# Altium PCB board.PcbDoc (part 2 of 3)
Units mm, origin at the board's own origin, x right, y up, seen from the top; angles counter-clockwise.
Board outline 86 x 120 mm, 4 copper layers (Top Layer, Signal Layer 1, Signal Layer 2, Bottom Layer), stack 1.571 mm thick; 144 components, 93 nets, 930 pads, 372 vias.
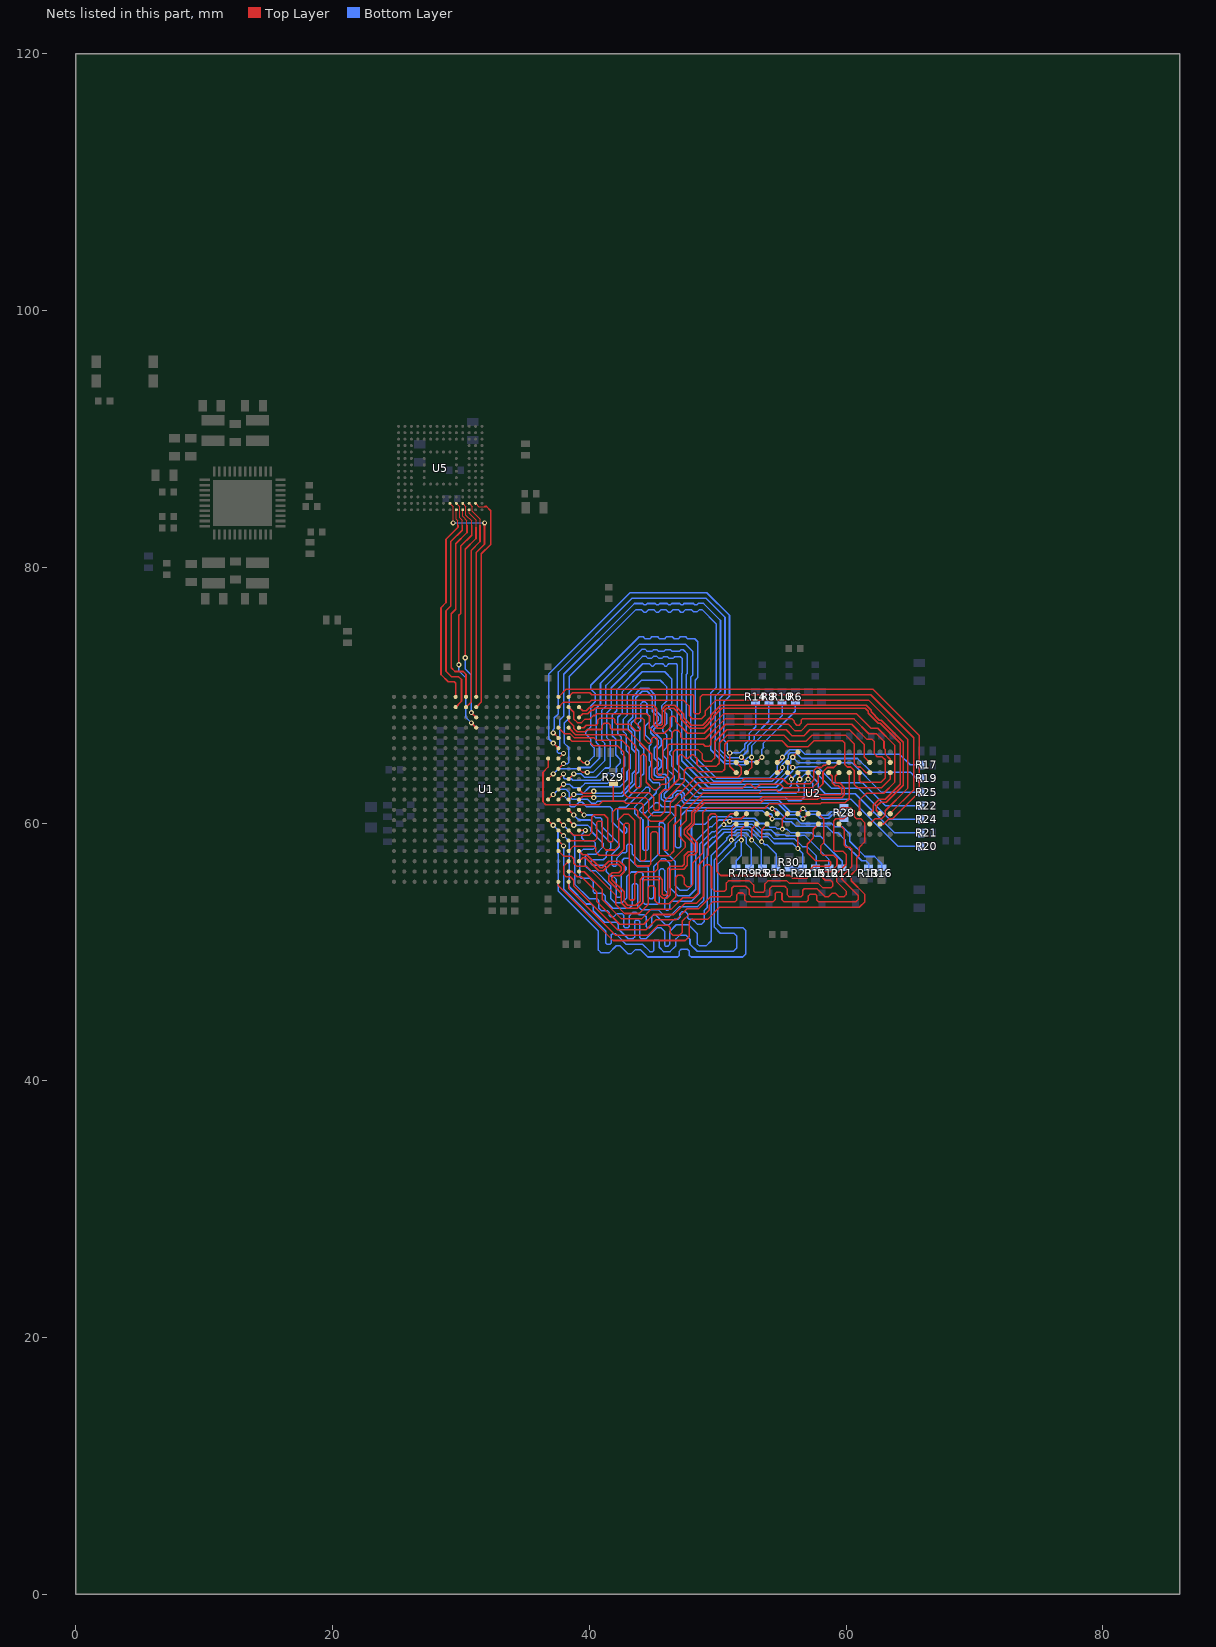
[diagram p4: the nets of this part, all layers, seen from the top]

## Via types
v1: diameter 0.4, hole 0.2, Top Layer to Bottom Layer, tented both sides, 309 vias
v2: diameter 0.6, hole 0.3, Top Layer to Bottom Layer, tented both sides, 61 vias
v3: diameter 0.4, hole 0.2, Top Layer to Signal Layer 1, tented top, 2 vias

## Nets (pads, with @x,y where several pads share a name; then routed paths per layer and width w, separated by ;. In a path a pad name is that pad's centre, name@x,y a point inside that pad or via, vN(x,y) a via of type N, cw(c..) or ccw(c..) an arc to the next point about the centre after c; other vN are vias at no path point) (continued)
DDR_A4: R5.1 U1.P17 U2.P8 | length 39.6
  Top Layer w0.12: U1.P17@37.6,59.5 v1(38,59.1) ; v1(52.65,58.75) 52.65,59.6 U2.P8@53.05,60
  Bottom Layer w0.12: v1(38,59.1) 38.44,58.66 38.44,55.117 39.787,53.77 40.16,53.77 40.32,53.61 40.32,53.237 41.217,52.34 42.13,52.34 42.27,52.2 42.27,51.836 43.046,51.06 43.39,51.06 43.53,51.2 43.53,52.41 43.615,52.495 43.845,52.495 43.95,52.39 43.95,51.16 44.05,51.06 44.43,51.06 45.304,51.934 45.574,51.934 45.869,51.639 45.869,50.571 45.96,50.48 46.12,50.48 46.29,50.65 46.29,51.648 46.786,52.144 47.732,52.144 48.43,51.446 48.43,50.65 48.58,50.5 49.1,50.5 49.5,50.9 49.5,57.55 50.71,58.76 50.71,58.899 50.921,59.11 51.37,59.11 51.59,59.33 52.19,59.33 52.65,58.87 v1(52.65,58.75) 52.679,58.75 53.41,58.019 53.41,56.7 R5.1@53.5,56.61
DDR_A5: R6.1 U1.H17 U2.P2 | length 43.5
  Top Layer w0.12: U1.H17@37.6,64.3 v1(38,64.7) ; U2.P2@53.05,64.8 v1(53.45,65.2)
  Bottom Layer w0.12: v1(38,64.7) 38.3,64.7 38.4,64.8 38.4,65.95 38.04,66.31 38.04,67.843 38.44,68.243 38.44,71.498 43.642,76.7 44.044,76.7 44.259,76.484 44.416,76.484 44.631,76.7 45.019,76.7 45.244,76.475 45.381,76.475 45.606,76.7 45.969,76.7 46.164,76.504 46.346,76.504 46.541,76.7 46.936,76.7 47.136,76.5 47.3,76.5 47.5,76.7 47.954,76.7 48.139,76.514 48.4,76.514 48.586,76.7 48.787,76.7 49.9,75.587 49.9,70.625 49.475,70.2 49.475,65.775 50.56,64.69 51.39,64.69 51.46,64.62 52.15,64.62 52.37,64.84 53.09,64.84 v1(53.45,65.2) 53.45,65.811 53.59,65.951 53.57,65.971 53.57,66.3 56.05,68.78 R6.1@56.05,69.45
DDR_A6: R7.1 U1.N16 U2.R8 | length 40.5
  Top Layer w0.12: U1.N16@36.8,60.3 v1(37.2,59.9) ; v1(51.85,58.75) 51.85,59.6 U2.R8@52.25,60
  Bottom Layer w0.12: v1(37.2,59.9) 37.57,59.53 37.57,57.69 37.6,57.66 37.6,54.769 40.719,51.65 40.719,50.181 40.94,49.96 41.54,49.96 42.099,50.519 42.399,50.519 43.008,49.91 43.29,49.91 43.6,50.22 43.976,50.22 44.556,49.64 45.114,49.64 46.89,49.64 47,49.75 47,50.075 47.175,50.25 47.64,50.25 47.79,50.1 47.79,49.785 47.935,49.64 51.965,49.64 52.2,49.875 52.2,51.7 51.975,51.925 50.335,51.925 50.025,52.235 50.025,56.887 51.088,57.95 51.088,57.957 51.381,58.25 51.381,58.499 51.632,58.75 v1(51.85,58.75) 51.85,57.54 51.45,57.14 R7.1@51.45,56.61
DDR_A7: R8.1 U1.E17 U2.R2 | length 39.6
  Top Layer w0.12: v1(37.2,67.1) U1.E17@37.6,66.7 ; v1(51.85,65.2) U2.R2@52.25,64.8
  Bottom Layer w0.12: v1(37.2,67.1) 37.2,67.35 37.28,67.43 37.28,68.271 37.6,68.591 37.6,71.846 43.352,77.598 49.077,77.598 50.575,76.1 50.575,70.175 50.15,69.75 50.15,65.821 50.801,65.17 51.82,65.17 v1(51.85,65.2) 52.35,65.7 52.35,66.109 52.87,66.629 52.87,66.883 53.99,68.003 R8.1@53.99,69.45
DDR_A8: R9.1 U1.R17 U2.T8 | length 39.7
  Top Layer w0.12: U1.R17@37.6,58.7 v1(38,58.3) ; v1@51.09,58.77 51.09,59.64 U2.T8@51.45,60
  Bottom Layer w0.12: v1(38,58.3) 38.02,58.28 38.02,54.943 41.29,51.673 41.29,50.73 41.39,50.63 41.6,50.63 41.71,50.74 41.71,51.37 41.81,51.47 42.042,51.47 42.872,50.64 44.15,50.64 44.73,50.06 44.94,50.06 45.03,50.15 45.03,50.88 45.1,50.95 45.374,50.95 45.449,50.875 45.449,50.397 45.786,50.06 46.294,50.06 46.753,50.519 46.753,51.053 47.025,51.325 47.55,51.325 47.85,51.025 47.85,50.636 48.406,50.08 51.23,50.08 51.5,50.35 51.5,51.275 51.275,51.5 50.2,51.5 49.75,51.95 49.75,57.213 51.07,58.533 v1(51.07,58.75) ; v1@51.11,58.75 51.321,58.75 51.681,59.11 52.02,59.11 52.22,58.91 52.22,58.48 52.61,58.09 52.61,56.74 R9.1@52.48,56.61
DDR_A9: R10.1 U1.G17 U2.R3 | length 43
  Top Layer w0.12: U1.G17@37.6,65.1 v1(38,65.5) ; U2.R3@52.25,64 52.65,64.4 v1(52.65,65.2)
  Bottom Layer w0.12: v1(38,65.5) 37.625,65.5 37.525,65.6 37.525,65.775 37.7,65.95 37.7,68.097 38.02,68.417 38.02,71.672 43.523,77.175 44.163,77.175 44.263,77.075 44.412,77.075 44.512,77.175 45.138,77.175 45.238,77.075 45.387,77.075 45.487,77.175 46.088,77.175 46.188,77.075 46.322,77.075 46.422,77.175 47.055,77.175 47.155,77.075 47.281,77.075 47.381,77.175 48.125,77.175 48.225,77.075 48.39,77.075 48.493,77.178 48.903,77.178 50.225,75.856 50.225,70.35 49.8,69.925 49.8,65.831 50.701,64.93 51.59,64.93 51.68,64.84 52,64.84 52.36,65.2 v1(52.65,65.2) 52.65,66.069 55.02,68.439 R10.1@55.02,69.45
DDR_A10: R11.1 U1.M19 U2.L7 | length 42.3
  Top Layer w0.12: U1.M19@39.22,61.1 U1.M19@39.2,61.1 v1(39.6,60.7) ; v1(55.05,59.6) 55.05,60.4 U2.L7@55.45,60.8
  Bottom Layer w0.12: v1(39.6,60.7) 40.282,60.7 40.482,60.5 40.875,60.5 40.96,60.415 40.96,59.816 42.34,58.436 42.34,58.2 41.74,57.6 41.74,56.85 41.865,56.725 42.05,56.725 42.15,56.825 42.16,56.825 42.16,57.344 42.56,57.744 42.814,57.744 42.93,57.86 42.93,58.33 43.04,58.44 43.24,58.44 43.35,58.33 43.35,57.673 43.923,57.101 44.848,57.101 45.45,57.703 45.45,60.04 45.5,60.09 45.74,60.09 45.87,59.96 45.87,57.922 46.71,57.082 46.71,55.212 47.094,54.828 47.618,54.828 47.966,55.176 47.966,59.791 48.15,59.975 49.025,59.975 49.61,60.56 50.91,60.56 51.089,60.56 51.199,60.45 52.89,60.45 53.3,60.04 53.79,60.04 54.067,59.763 54.5,59.763 54.62,59.643 55.007,59.643 v1(55.05,59.6) 55.41,59.6 55.68,59.33 57.29,59.33 57.56,59.06 57.999,59.06 58.26,58.799 58.26,58.53 59.7,57.09 R11.1@59.7,56.61
DDR_A11: R12.1 U1.M18 U2.R7 | length 46.6
  Top Layer w0.12: U1.M18@38.4,61.1 v1(38.8,60.7) ; v1@50.94,60.21 51.13,60.4 51.85,60.4 U2.R7@52.25,60.8
  Bottom Layer w0.12: v1(38.8,60.7) 39.19,60.31 40.078,60.31 40.54,59.848 40.54,59.642 41.688,58.494 41.688,58.142 41.32,57.774 41.32,57.43 41.1,57.21 40.25,57.21 40.12,57.08 40.12,56.92 40.25,56.79 41.16,56.79 41.16,56.78 41.31,56.63 41.31,56.316 41.676,55.95 41.85,55.95 42.09,55.71 42.09,54.38 42.19,54.28 42.37,54.28 42.51,54.42 42.51,56.079 42.866,56.434 42.866,56.624 42.58,56.91 42.58,57.17 42.734,57.324 43.105,57.324 43.749,56.681 44.5,56.681 44.61,56.571 44.61,54.29 44.725,54.175 44.915,54.175 45.03,54.29 45.03,56.689 45.625,57.284 45.914,57.284 46.29,56.908 46.29,55.038 46.92,54.408 47.792,54.408 48.3,54.916 48.3,58.675 49.424,59.799 49.569,59.799 50.08,60.31 50.84,60.31 50.94,60.21 52.79,60.21 53.457,59.543 54.177,59.543 54.56,59.16 55.24,59.16 55.32,59.08 56.471,59.08 56.501,59.11 56.799,59.11 58.67,57.239 R12.1@58.67,56.61
  other v1: 50.94,60.2
DDR_A12: R13.1 U1.L17 U2.N7 | length 47.2
  Top Layer w0.12: U1.L17@37.6,61.9 v1(38,62.3) ; U2.N7@53.85,60.8 v1(54.25,60.4)
  Bottom Layer w0.12: v1(38,62.3) 38,62.23 38.49,61.74 38.49,61.42 38.58,61.33 38.85,61.33 39.21,61.69 39.45,61.69 39.81,61.33 41.64,61.33 41.8,61.17 41.8,60.164 42.684,59.28 42.82,59.28 42.93,59.39 42.93,59.646 42.22,60.356 42.22,61.16 42.38,61.32 42.889,61.32 44.419,62.85 44.625,62.85 44.725,62.75 44.725,62.525 43.53,61.33 43.53,60.846 43.906,60.47 44.04,60.47 44.19,60.32 44.19,58.021 44.271,57.941 44.5,57.941 44.61,58.051 44.61,60.516 45.024,60.93 46.37,60.93 46.71,60.59 46.71,58.27 46.84,58.14 47.006,58.14 47.126,58.26 47.126,60.646 47.52,61.04 53.5,61.04 53.76,60.78 54.17,60.78 54.25,60.7 v1(54.25,60.4) 54.931,60.4 55.151,60.18 55.74,60.18 56.1,59.82 58.49,59.82 58.975,59.335 59.355,59.335 59.93,58.76 59.93,58.43 61.22,57.14 61.56,57.14 61.76,56.94 R13.1@61.76,56.61
DDR_A13: R14.1 U1.F17 U2.T3 | length 41.6
  Top Layer w0.12: v1(37.2,66.3) U1.F17@37.6,65.9 ; v1(50.95,65.53) 50.95,64.5 U2.T3@51.45,64
  Bottom Layer w0.12: v1@37.2,66.28 37.19,66.29 36.84,66.64 36.84,71.68 43.178,78.018 49.157,78.018 50.925,76.25 50.925,69.95 50.485,69.51 50.485,66.535 50.74,66.28 50.74,65.74 v1(50.95,65.53) 51.18,65.53 51.21,65.56 51.77,65.56 52.11,65.9 52.11,66.208 52.45,66.548 52.45,67.057 52.97,67.577 R14.1@52.97,69.45
DDR_A14: R15.1 U1.N18 U2.T7 | length 45
  Top Layer w0.12: U1.N18@38.4,60.3 v1(38.8,59.9) ; v1(50.49,59.95) 50.49,60.28 51.01,60.8 U2.T7@51.45,60.8
  Bottom Layer w0.12: v1(38.8,59.9) 38.81,59.89 39.904,59.89 40.12,59.674 40.12,59.468 41.084,58.504 41.084,58.21 40.504,57.63 39.854,57.63 39.7,57.476 39.7,56.746 40.076,56.37 40.48,56.37 41.67,55.18 41.67,54.206 42.016,53.86 42.544,53.86 42.93,54.246 42.93,55.905 43.286,56.261 44.059,56.261 44.19,56.13 44.19,53.9 44.335,53.755 45.325,53.755 45.45,53.88 45.45,56.375 45.575,56.5 45.75,56.5 45.87,56.38 45.87,54.864 46.07,54.664 46.07,54.36 45.87,54.16 45.87,53.42 46.02,53.27 46.13,53.27 46.29,53.43 46.29,53.876 46.402,53.988 47.966,53.988 48.625,54.647 48.625,58.465 49.539,59.379 49.749,59.379 50.32,59.95 v1(50.49,59.95) 50.5,59.95 50.62,59.83 51.089,59.83 51.249,59.99 52.68,59.99 53.43,59.24 53.997,59.24 54.397,58.84 56.009,58.84 56.61,58.239 56.971,58.239 57.67,57.54 57.67,56.64 R15.1@57.64,56.61
DDR_A15: R16.1 U1.L16 U2.M7 | length 48.7
  Top Layer w0.12: U1.L16@36.8,61.9 v1(37.2,62.3) ; v1(54.25,61.2) U2.M7@54.65,60.8
  Bottom Layer w0.12: v1(37.2,62.3) 37.6,62.7 38.19,62.7 38.44,62.45 38.44,62.151 38.651,61.94 39.849,61.94 40.189,61.6 40.48,61.6 40.65,61.77 42.745,61.77 43.994,63.019 43.994,63.651 44.25,63.907 44.25,65.832 43.95,66.132 43.95,67.402 43.81,67.542 43.81,67.825 44.03,68.045 44.03,69.38 44.175,69.525 44.35,69.525 44.5,69.375 44.5,68.62 44.7,68.42 44.7,67.965 44.37,67.635 44.37,66.925 44.81,66.485 44.81,66.22 44.67,66.08 44.67,64.95 44.795,64.825 44.795,64.55 44.67,64.425 44.67,63.52 44.97,63.22 45.419,63.22 45.509,63.13 45.509,62.904 45.22,62.615 45.22,62.426 43.95,61.156 43.95,61.02 44.08,60.89 44.39,60.89 45.16,61.66 45.375,61.66 45.685,61.35 46.635,61.35 46.755,61.47 46.98,61.47 47.17,61.28 53.9,61.28 53.98,61.2 v1(54.25,61.2) 54.52,61.2 55.32,60.4 56.141,60.4 56.501,60.04 58.88,60.04 59.13,59.79 59.73,59.79 60.29,59.23 60.29,58.651 61.471,57.47 62.22,57.47 62.79,56.9 R16.1@62.79,56.61
DDR_BA0: R17.1 U1.G19 U2.M2 | length 47.9
  Top Layer w0.12: U1.G19@39.2,65.1 39.54,64.76 v1(39.85,64.76) ; U2.M2@54.65,64.8 v1(55.05,65.2)
  Bottom Layer w0.12: v1(39.85,64.76) 40.38,65.29 40.38,65.923 40.12,66.183 40.12,66.626 39.72,67.026 39.72,67.147 40.12,67.547 40.12,69.184 40.46,69.524 40.46,70.184 40.12,70.524 40.12,70.802 43.893,74.575 44.209,74.575 44.35,74.434 44.725,74.434 44.866,74.575 45.334,74.575 45.475,74.434 45.875,74.434 46.016,74.575 46.475,74.575 46.616,74.434 46.95,74.434 47.091,74.575 47.51,74.575 47.66,74.425 48.225,74.425 48.45,74.2 48.45,71.4 48.25,71.2 48.25,65.225 49.895,63.58 54.059,63.58 54.64,64.161 54.64,64.551 55.05,64.961 v1(55.05,65.2) 55.27,65.42 55.27,65.44 55.61,65.78 55.63,65.78 55.64,65.79 56.46,65.79 56.83,65.42 64.19,65.42 65,64.61 R17.1@65.85,64.61
DDR_BA1: R18.1 U1.N17 U2.N8 | length 37.7
  Top Layer w0.12: U1.N17@37.6,60.3 v1(38,59.9) ; v1@53.43,58.639 53.43,59.58 U2.N8@53.85,60
  Bottom Layer w0.12: v1(38,59.9) 38.86,59.04 38.86,55.331 40.001,54.19 40.6,54.19 40.74,54.05 40.74,53.451 40.935,53.255 41.433,53.255 41.545,53.143 41.545,52.88 41.665,52.76 41.9,52.76 42.16,53.02 42.55,53.02 42.69,52.88 42.69,52.01 42.79,51.91 43.002,51.91 43.11,52.018 43.11,52.836 43.412,53.138 43.648,53.138 43.871,52.915 44.295,52.915 44.44,52.77 44.44,52.02 44.55,51.91 44.686,51.91 44.86,52.084 44.86,52.755 45.02,52.915 45.187,52.915 45.962,52.14 46.188,52.14 46.612,52.564 46.914,52.564 47.07,52.72 47.07,53.022 47.196,53.148 47.525,53.148 47.675,52.998 47.675,52.689 47.789,52.575 48.025,52.575 48.425,52.175 48.725,52.175 48.975,52.425 48.975,53.275 49.2,53.5 49.2,58.025 50.525,59.35 51.299,59.35 51.499,59.55 52.411,59.55 53.331,58.63 v1(53.43,58.63) 53.67,58.39 53.839,58.39 54.56,57.669 54.56,56.64 R18.1@54.53,56.61
DDR_BA2: R19.1 U1.J16 U2.M3 | length 49.3
  Top Layer w0.12: U1.J16@36.8,63.5 v1(37.2,63.9) v1@37.21,63.91 ; U2.M3@54.65,64 v1@55.03,64.38
  Bottom Layer w0.12: v1(37.2,63.9) 37.6,64.3 39.1,64.3 39.2,64.4 40.084,64.4 40.8,65.116 40.8,66.097 40.54,66.357 40.54,69.01 40.88,69.35 40.88,70.968 43.926,74.014 47.477,74.014 48.075,73.416 48.075,71.625 47.925,71.475 47.925,65.075 49.66,63.34 54.25,63.34 55.05,64.14 v1(55.05,64.4) 55.05,64.65 55.44,65.04 55.44,65.089 55.49,65.139 55.49,65.349 55.701,65.56 56.09,65.56 56.55,65.1 60.9,65.1 61.96,64.04 65.01,64.04 65.48,63.57 R19.1@65.85,63.57
DDR_CASN: R21.1 U1.K17 U2.K3 | length 49.1
  Top Layer w0.12: U1.K17@37.6,62.7 37.61,62.7 v1@38.005,63.095 ; U2.K3@56.25,64 56.25,63.92 56.4,63.77 v1(56.4,63.49)
  Bottom Layer w0.12: v1@38.02,63.08 v1(38,63.1) 38.47,63.1 38.75,62.82 39.33,62.82 39.67,63.16 41.424,63.16 41.594,63.33 42.226,63.33 42.524,63.628 42.524,64.26 42.78,64.516 42.78,65.223 42.48,65.523 42.48,66.793 42.22,67.053 42.22,68.314 42.56,68.654 42.56,70.272 44.138,71.85 45.875,71.85 46.445,71.28 46.445,69.391 46.2,69.146 46.2,69.01 46.445,68.764 46.445,67.631 46.28,67.465 46.28,67.3 46.445,67.134 46.445,65.776 46.28,65.61 46.28,65.42 46.445,65.254 46.445,64.501 47.039,63.908 47.039,63.62 47.15,63.509 47.438,63.509 48.566,62.38 56.1,62.38 56.33,62.61 56.33,62.87 56.17,63.03 56.17,63.21 56.17,63.26 v1(56.4,63.49) 56.77,63.86 57.199,63.86 57.84,63.219 57.84,62.91 58.39,62.36 ; 58.34,62.4 58.38,62.36 58.39,62.36 ; R21.1@65.85,59.31 63.77,59.31 60.72,62.36 58.39,62.36
DDR_CKE: R23.1 R30.2 U1.P19 U2.K9 | length 38.3
  Top Layer w0.12: U1.P19@39.2,59.5 v1(39.7,59.5) ; v1(56.25,58.09) U2.K9@56.25,59.2
  Bottom Layer w0.12: v1(39.7,59.5) 39.7,59.47 39.41,59.18 39.41,58.92 39.64,58.69 40.3,58.69 40.302,58.692 40.48,58.514 40.48,58.2 40.33,58.05 39.56,58.05 39.28,57.77 39.28,55.86 39.37,55.77 40.055,55.77 40.3,55.525 40.3,54.74 40.43,54.61 41.03,54.61 41.25,54.39 41.25,54.032 41.842,53.44 43.12,53.44 43.35,53.67 43.35,55.25 43.45,55.35 43.675,55.35 43.77,55.255 43.77,53.61 44.045,53.335 45.361,53.335 45.936,52.76 46.214,52.76 47.022,53.568 48.444,53.568 48.925,54.049 48.925,58.3 49.6,58.975 49.729,58.975 50.341,59.587 50.341,59.59 51.16,59.59 51.228,59.59 51.408,59.77 52.54,59.77 53.29,59.02 53.88,59.02 54.42,58.48 55.86,58.48 v1(56.25,58.09) 56.64,57.7 56.64,56.64 R23.1@56.61,56.61 56.57,56.57 R30.2@55.57,56.57
DDR_CLK_N: R28.1 U1.K19 U2.K7 | length 40.4
  Top Layer w0.1: U1.K19@39.2,62.7 39.49,62.41 40.21,62.41 v1(40.35,62.55) ; U2.K7@56.25,60.8 v1(56.65,61.2)
  Bottom Layer w0.1: v1(40.35,62.55) 40.49,62.41 42.48,62.41 43.354,63.284 43.354,63.916 43.61,64.172 43.61,65.567 43.31,65.867 43.31,67.137 43.05,67.397 43.05,67.97 43.39,68.31 43.39,69.915 44.031,70.556 44.619,70.556 45.158,70.017 45.158,68.868 45.615,68.41 45.615,67.975 45.01,67.37 45.01,67.19 45.615,66.585 45.615,66.12 45.31,65.815 45.31,65.215 45.615,64.91 45.615,64.455 45.31,64.15 45.31,63.95 45.4,63.86 45.913,63.86 46.209,63.564 46.209,62.699 45.86,62.35 45.86,62.08 45.95,61.99 46.37,61.99 46.52,62.14 46.52,62.305 46.813,62.599 47.174,62.599 47.42,62.353 47.42,61.935 47.505,61.85 54.775,61.85 55.665,60.96 56.41,60.96 v1(56.65,61.2) 56.7,61.2 56.94,60.96 57.145,60.96 57.175,60.99 57.755,60.99 58.075,60.67 58.56,60.67 58.86,60.97 59.5,60.97 R28.1@59.85,61.32
DDR_CLK_P: R28.2 U1.L19 U2.J7 | length 40.4
  Top Layer w0.1: U1.L19@39.2,61.9 39.48,62.18 40.22,62.18 v1(40.35,62.05) ; v1(56.65,60.4) U2.J7@57.05,60.8
  Bottom Layer w0.1: v1(40.35,62.05) 40.48,62.18 42.575,62.18 43.584,63.189 43.584,63.821 43.84,64.077 43.84,65.662 43.54,65.962 43.54,67.232 43.28,67.492 43.28,67.875 43.62,68.215 43.62,69.82 44.126,70.326 44.524,70.326 44.928,69.922 44.928,68.772 45.385,68.315 45.385,68.07 44.78,67.465 44.78,67.095 45.385,66.49 45.385,66.215 45.08,65.91 45.08,65.12 45.385,64.815 45.385,64.55 45.08,64.245 45.08,63.855 45.305,63.63 45.817,63.63 45.979,63.469 45.979,62.794 45.63,62.445 45.63,61.985 45.855,61.76 46.465,61.76 46.75,62.045 46.75,62.21 46.909,62.369 47.079,62.369 47.19,62.257 47.19,61.84 47.41,61.62 54.68,61.62 55.57,60.73 56.317,60.73 v1@56.605,60.443 ; v1(56.65,60.4) 56.98,60.73 57.24,60.73 57.27,60.76 57.66,60.76 57.98,60.44 58.655,60.44 58.955,60.74 59.53,60.74 R28.2@59.85,60.42
DDR_CSN: R22.1 U1.J18 U2.L2 | length 47.3
  Top Layer w0.12: U1.J18@38.4,63.5 v1(38.8,63.9) ; U2.L2@55.45,64.8 v1(55.85,64.4)
  Bottom Layer w0.12: v1(38.8,63.9) 39.389,63.9 39.639,63.65 40.522,63.65 41.232,64.36 41.535,64.36 41.64,64.465 41.64,66.445 41.38,66.705 41.38,68.662 41.72,69.002 41.72,70.62 44.15,73.05 44.425,73.05 44.425,73.045 44.575,72.895 44.845,72.895 45,73.05 45.275,73.05 45.43,72.895 45.67,72.895 45.813,73.038 46.082,73.038 46.225,72.895 46.52,72.895 46.66,73.035 47.095,73.035 47.25,72.88 47.25,71.775 47.2,71.725 47.2,64.934 49.274,62.86 54.57,62.86 55.85,64.14 v1(55.85,64.4) 56.197,64.4 56.257,64.46 57.787,64.46 59.047,63.2 61.3,63.2 63.07,61.43 R22.1@65.85,61.43
DDR_DQ0: U1.A17 U2.B8 | length 38.3
  Top Layer w0.12: U1.A17@37.6,69.9 38.19,70.49 62.112,70.49 65.7,66.902 65.7,62.487 63.618,60.405 63.345,60.405 62.94,60 U2.B8@62.65,60
DDR_DQ1: U1.A18 U2.A7 | length 37.8
  Top Layer w0.12: U1.A18@38.4,69.9 38.4,69.92 38.7,70.22 40.041,70.22 40.191,70.07 48.08,70.07 48.15,70 48.15,68.675 48.225,68.6 48.55,68.6 48.65,68.7 48.65,69.9 48.82,70.07 61.93,70.07 65.275,66.725 65.275,62.656 U2.A7@63.47,60.851
DDR_DQ2: U1.D18 U2.C2 | length 38.9
  Top Layer w0.12: U1.D18@38.4,67.5 38.96,66.94 42.768,66.94 43.61,66.098 43.61,62.915 43.7,62.825 43.925,62.825 44.03,62.93 44.03,65.304 44.15,65.424 44.284,65.424 44.45,65.258 44.45,63.244 45.044,62.65 45.21,62.65 45.64,63.08 45.978,63.08 46.55,63.652 46.55,65.61 46.74,65.8 48.47,65.8 48.814,65.456 48.814,65.05 48.964,64.9 49.525,64.9 49.775,65.15 49.775,66.4 50.715,67.34 55.339,67.34 55.819,66.86 56.701,66.86 57.181,67.34 60.279,67.34 61.41,66.209 61.41,65.24 U2.C2@61.85,64.8
DDR_DQ3: U1.B17 U2.C8 | length 38.6
  Top Layer w0.12: U1.B17@37.6,69.1 38,69.5 40.041,69.5 40.191,69.65 47.325,69.65 47.78,69.195 47.78,68.445 48.025,68.2 48.75,68.2 49.05,68.5 49.05,68.825 49.875,69.65 61.75,69.65 64.8,66.6 64.8,62.775 63.05,61.025 63.05,60.691 62.759,60.4 62.25,60.4 U2.C8@61.85,60
DDR_DQ4: U1.E18 U2.A3 | length 39
  Top Layer w0.12: U1.E18@38.4,66.7 38.64,66.46 39.974,66.46 40.334,66.1 42.2,66.1 42.69,65.61 42.69,62.374 43.034,62.03 44.416,62.03 44.62,61.826 44.62,60.976 44.956,60.64 45.554,60.64 45.88,60.966 45.88,61.794 47.4,63.314 47.4,64.15 47.625,64.375 48.175,64.375 48.49,64.06 50.34,64.06 50.55,64.27 50.55,66.21 50.82,66.48 55.011,66.48 55.471,66.02 57.049,66.02 57.509,66.48 59.73,66.48 59.89,66.32 59.89,64.651 60.101,64.44 60.37,64.44 60.65,64.16 60.65,63.08 60.91,62.82 62.766,62.82 63.45,63.504 U2.A3@63.45,64
DDR_DQ5: U1.D17 U2.C3 | length 38.2
  Top Layer w0.12: U1.D17@37.6,67.5 38.06,67.04 38.513,67.04 38.853,66.7 40.38,66.7 40.56,66.52 42.555,66.52 43.11,65.965 43.11,62.548 43.208,62.45 44.63,62.45 45.04,62.04 45.04,61.15 45.13,61.06 45.38,61.06 45.46,61.14 45.46,62.306 45.814,62.66 46.152,62.66 46.97,63.478 46.97,65.28 47.07,65.38 47.26,65.38 47.52,65.12 47.69,65.12 47.95,65.38 48.148,65.38 48.394,65.134 48.394,64.67 48.584,64.48 49.87,64.48 50.12,64.73 50.12,66.295 50.725,66.9 55.185,66.9 55.645,66.44 56.875,66.44 57.335,66.9 59.99,66.9 60.65,66.24 60.65,64.691 60.901,64.44 61.119,64.44 61.559,64 U2.C3@61.85,64
DDR_DQ6: U1.D19 U2.A2 | length 38.5
  Top Layer w0.12: U1.D19@39.2,67.5 39.57,67.5 39.77,67.7 40.55,67.7 40.675,67.825 40.675,68.1 40.825,68.25 41.875,68.25 42,68.125 42,67.9 42.125,67.775 43.134,67.775 43.65,67.259 43.884,67.259 43.975,67.35 43.975,67.525 43.55,67.95 43.55,68.1 43.675,68.225 44.15,68.225 44.3,68.075 44.3,66.6 44.625,66.275 44.775,66.275 44.875,66.375 44.875,66.65 44.975,66.75 45.2,66.75 45.29,66.66 45.29,63.935 45.425,63.8 45.575,63.8 45.71,63.935 45.71,66.51 45.84,66.64 46.34,66.64 46.457,66.757 46.457,67.107 46.65,67.3 46.9,67.3 47.12,67.08 47.12,66.78 47.26,66.64 49.04,66.64 50.58,68.18 55.82,68.18 55.97,68.03 55.97,67.897 56.167,67.7 56.353,67.7 56.5,67.847 56.5,68.08 56.6,68.18 60.628,68.18 61.778,67.03 62.37,67.03 62.96,66.44 62.96,65.89 63.04,65.81 63.04,65.46 63.45,65.05 U2.A2@63.45,64.8
DDR_DQ7: U1.B18 U2.D7 | length 38.3
  Top Layer w0.12: U1.B18@38.4,69.1 38.8,68.7 38.8,68.18 39.08,67.9 39.4,67.9 39.67,68.17 40.045,68.17 40.325,68.45 40.476,68.45 40.626,68.6 44.44,68.6 44.675,68.365 44.675,67.505 45.12,67.06 45.85,67.06 46.31,67.52 46.31,68.285 46.425,68.4 46.6,68.4 46.73,68.27 46.73,68.011 47.681,67.06 48.96,67.06 50.5,68.6 60.802,68.6 61.952,67.45 62.479,67.45 63.81,66.119 63.81,63.27 62.94,62.4 61.59,62.4 61.05,61.86 U2.D7@61.05,60.8
DDR_DQ8: U1.P18 U2.G2 | length 39.3
  Top Layer w0.12: U1.P18@38.4,59.5 38.79,59.11 39.96,59.11 40.18,59.33 40.18,60.53 40.375,60.725 41.175,60.725 41.45,60.45 41.45,58.725 41.55,58.625 41.775,58.625 41.85,58.7 41.85,60.95 42.09,61.19 43.61,61.19 43.78,61.02 43.78,60.628 43.97,60.438 43.97,57.22 44.04,57.15 44.28,57.15 44.39,57.26 44.39,59.67 44.52,59.8 45.62,59.8 45.75,59.67 45.75,58.07 45.86,57.96 46.07,57.96 46.17,58.06 46.17,60.068 46.72,60.618 46.72,61.446 48.494,63.22 51.773,63.22 52.073,63.52 55.08,63.52 55.47,63.13 57.189,63.13 57.49,63.431 57.49,64.16 57.73,64.4 58.09,64.4 58.26,64.57 58.4,64.57 58.63,64.8 U2.G2@58.65,64.8
DDR_DQ9: U1.T17 U2.E3 | length 38.3
  Top Layer w0.12: U1.T17@37.6,57.9 38,57.5 38.6,57.5 38.8,57.3 38.8,56.94 39.04,56.7 39.82,56.7 42.08,54.44 42.08,53.705 42.755,53.03 43.895,53.03 44.6,53.735 44.6,55.06 44.72,55.18 44.995,55.18 45.125,55.05 45.125,54.025 45.357,53.793 46.228,53.793 46.74,54.305 46.74,55.84 46.9,56 47.2,56 47.4,55.8 47.4,55.325 47.6,55.125 47.875,55.125 48.075,55.325 48.075,56.985 48.84,57.75 48.84,60.893 49.167,61.22 53.67,61.22 54.01,61.56 58.005,61.56 58.095,61.65 59.925,61.65 60.25,61.975 U2.E3@60.25,64
DDR_DQ10: U1.R18 U2.H3 | length 38.3
  Top Layer w0.12: U1.R18@38.4,58.7 40.42,58.7 40.6,58.88 40.6,60.15 40.675,60.225 40.95,60.225 41.03,60.145 41.03,58.245 41.3,57.975 41.975,57.975 42.29,58.29 42.29,60.326 42.734,60.77 43.044,60.77 43.55,60.264 43.55,56.91 43.73,56.73 44.66,56.73 44.81,56.88 44.81,59.286 44.904,59.38 45.23,59.38 45.33,59.28 45.33,57.71 45.5,57.54 46.244,57.54 46.59,57.886 46.59,59.894 47.14,60.444 47.14,61.272 48.668,62.8 51.947,62.8 52.247,63.1 52.56,63.1 52.86,62.8 53.016,62.8 53.316,63.1 54.906,63.1 55.196,62.81 57.361,62.81 57.85,63.299 U2.H3@57.85,64
DDR_DQ11: U1.V19 U2.H8 | length 38.3
  Top Layer w0.12: U1.V19@39.2,56.28 39.62,56.28 41.025,54.875 41.025,54.1 42.515,52.61 44.069,52.61 44.832,53.373 46.402,53.373 47.279,54.25 48.15,54.25 48.5,54.6 48.5,56.79 49.26,57.55 49.26,60.546 49.514,60.8 49.775,60.8 49.92,60.655 49.92,56.318 50.248,55.99 55.599,55.99 55.799,55.79 56.97,55.79 57.22,56.04 57.22,56.47 57.46,56.71 58.71,56.71 58.812,56.812 58.812,57.025 58.702,57.136 57.614,57.136 56.98,57.77 56.98,58.43 57.45,58.9 57.45,59.6 U2.H8@57.85,60
DDR_DQ12: U1.W18 U2.F8 | length 37.7
  Top Layer w0.12: U1.W18@38.4,55.5 38.4,54.977 42.027,51.35 44.591,51.35 45.353,52.113 46.137,52.113 46.3,51.95 46.3,51.563 46.513,51.35 47.05,51.35 47.25,51.55 47.25,52.439 47.801,52.99 49.036,52.99 49.335,53.29 49.335,53.66 49.605,53.93 51.35,53.93 51.475,54.055 51.475,54.475 51.625,54.625 51.975,54.625 52.125,54.475 52.125,54.075 52.27,53.93 54.31,53.93 54.474,54.094 54.474,54.574 54.6,54.7 54.9,54.7 55.014,54.586 55.014,54.096 55.18,53.93 56.9,53.93 57.075,54.105 57.075,54.4 57.205,54.53 57.62,54.53 57.726,54.424 57.726,54.074 57.87,53.93 60.766,53.93 60.94,54.104 60.94,54.444 59.69,55.694 59.69,55.93 60.43,56.67 60.43,58.06 60.295,58.195 60.015,58.195 59.85,58.36 59.85,59.6 U2.F8@59.45,60
DDR_DQ13: U1.T18 U2.F2 | length 38.3
  Top Layer w0.12: U1.T18@38.4,57.9 38.78,58.28 40.36,58.28 40.525,58.115 40.525,57.825 40.775,57.575 42.25,57.575 42.71,58.035 42.71,59.96 42.825,60.075 43.025,60.075 43.13,59.97 43.13,54.14 43.19,54.08 43.46,54.08 43.55,54.17 43.55,56.04 43.8,56.29 45.125,56.29 45.35,56.515 45.35,56.975 45.495,57.12 46.418,57.12 47.47,58.172 47.47,58.58 47.01,59.04 47.01,59.72 47.56,60.27 47.56,61.098 48.842,62.38 53.19,62.38 53.49,62.68 54.54,62.68 54.73,62.49 57.57,62.49 58.21,63.13 58.21,64.069 58.541,64.4 59.05,64.4 U2.F2@59.45,64.8
DDR_DQ14: U1.V18 U2.H7 | length 38.3
  Top Layer w0.12: U1.V18@38.4,56.3 38.66,56.3 39.06,55.9 39.406,55.9 40.596,54.71 40.596,53.969 42.375,52.19 44.243,52.19 45.005,52.953 46.576,52.953 47.453,53.83 48.355,53.83 48.9,54.375 48.9,56.625 49.1,56.825 49.375,56.825 49.525,56.675 49.525,55.025 49.8,54.75 50.525,54.75 50.675,54.9 50.675,55.395 50.85,55.57 52.48,55.57 52.8,55.25 52.8,54.8 52.9,54.7 53.575,54.7 53.675,54.8 53.675,55.32 53.925,55.57 55.403,55.57 55.603,55.37 57.855,55.37 58.2,55.025 58.825,55.025 58.975,55.175 58.975,55.45 58.8,55.625 58.375,55.625 58.15,55.85 58.15,56.175 58.265,56.29 58.814,56.29 59.3,56.776 59.3,57.3 59.044,57.556 58.2,57.556 58.02,57.736 58.02,58.29 58.25,58.52 58.25,60.4 U2.H7@57.85,60.8
DDR_DQ15: U1.W17 U2.F7 | length 38
  Top Layer w0.12: U1.W17@37.6,55.5 37.6,55.183 41.858,50.925 47.475,50.925 47.775,51.225 47.775,52.37 47.975,52.57 49.21,52.57 50.15,53.51 61.04,53.51 61.47,53.94 61.47,54.508 60.4,55.578 60.4,56.04 60.85,56.49 60.85,57.38 61.03,57.56 61.03,58.17 61.45,58.59 61.45,60.109 61.159,60.4 60.81,60.4 60.652,60.558 60.652,60.992 60.394,61.25 59.64,61.25 59.45,61.06 U2.F7@59.45,60.8
DDR_DQM0: U1.C18 U2.D3 | length 38.7
  Top Layer w0.12: U1.C18@38.4,68.3 38.4,68.03 38.8,67.63 38.8,67.447 39.067,67.18 39.67,67.18 39.85,67.36 40.935,67.36 41,67.425 41,67.675 41.175,67.85 41.5,67.85 41.65,67.7 41.65,67.46 41.75,67.36 42.942,67.36 44.87,65.432 44.87,63.63 45.05,63.45 45.754,63.45 46.13,63.826 46.13,66.13 46.22,66.22 48.875,66.22 49.045,66.05 49.325,66.05 49.475,66.2 49.475,66.6 50.635,67.76 55.513,67.76 55.993,67.28 56.527,67.28 57.007,67.76 60.454,67.76 61.604,66.61 62.01,66.61 62.21,66.41 62.21,65.46 62.43,65.24 62.812,65.24 63.05,65.002 63.05,63.575 62.715,63.24 61.185,63.24 61.05,63.375 U2.D3@61.05,64
DDR_DQM1: U1.U18 U2.E7 | length 38.3
  Top Layer w0.12: U1.U18@38.4,57.1 38,56.7 38,56.09 38.19,55.9 38.52,55.9 38.8,55.62 38.8,55.171 42.201,51.77 44.417,51.77 45.179,52.533 46.75,52.533 47.627,53.41 48.535,53.41 49.475,54.35 50.975,54.35 51.1,54.475 51.1,55 51.25,55.15 52.2,55.15 52.475,54.875 52.475,54.5 52.625,54.35 53.939,54.35 54.054,54.466 54.054,54.974 54.23,55.15 55.229,55.15 55.434,54.944 55.434,54.476 55.56,54.35 56.506,54.35 56.633,54.477 56.633,54.833 56.75,54.95 57.736,54.95 58.336,54.35 58.65,54.35 58.9,54.6 59.19,54.6 59.44,54.35 59.856,54.35 60.01,54.504 60.01,54.78 59.27,55.52 59.27,56.104 60.025,56.859 60.025,57.63 59.79,57.865 59.16,57.865 59.05,57.975 59.05,58.379 59.05,60.24 59.21,60.4 59.85,60.4 U2.E7@60.25,60.8
DDR_DQS0_N: U1.B19 U2.B7 | length 37.8
  Top Layer w0.1: U1.B19@39.2,69.09 39.48,68.81 39.78,68.81 40.06,69.09 40.211,69.09 40.361,69.24 45.01,69.24 45.27,68.98 45.27,67.815 45.385,67.7 45.585,67.7 45.67,67.785 45.67,68.955 45.955,69.24 46.665,69.24 47.37,68.535 47.37,68.276 47.946,67.7 48.824,67.7 49.475,68.351 49.475,68.48 50.235,69.24 61.594,69.24 61.969,68.865 61.969,68.725 62.604,68.09 62.744,68.09 64.45,66.384 64.45,63.005 63.145,61.7 62.7,61.7 62.37,61.37 62.37,61.08 U2.B7@62.65,60.8
DDR_DQS0_P: U1.C19 U2.C7 | length 37.4
  Top Layer w0.1: U1.C19@39.2,68.3 39.48,68.58 39.875,68.58 40.155,68.86 40.306,68.86 40.456,69.01 44.915,69.01 45.04,68.885 45.04,67.72 45.29,67.47 45.68,67.47 45.9,67.69 45.9,68.86 46.05,69.01 46.57,69.01 47.14,68.44 47.14,68.181 47.851,67.47 48.919,67.47 49.705,68.256 49.705,68.385 50.33,69.01 61.499,69.01 61.739,68.77 61.739,68.63 62.509,67.86 62.649,67.86 64.22,66.289 64.22,63.1 63.05,61.93 62.605,61.93 62.14,61.465 62.14,61.09 U2.C7@61.85,60.8
DDR_DQS1_N: U1.T19 U2.G3 | length 38
  Top Layer w0.1: U1.T19@39.2,57.9 39.49,57.61 39.815,57.61 40.845,56.58 41.005,56.58 41.53,57.105 42.345,57.105 42.72,56.73 42.72,56.295 42.4,55.975 41.9,55.975 41.75,55.825 41.75,55.675 42.72,54.705 42.72,53.97 43.02,53.67 43.63,53.67 43.96,54 43.96,55.655 44.185,55.88 45.485,55.88 45.7,55.665 45.7,54.545 45.813,54.433 45.963,54.433 46.1,54.57 46.1,56.505 46.305,56.71 47.26,56.71 47.42,56.87 47.42,57.542 47.715,57.837 48.092,57.837 48.19,57.935 48.19,58.44 47.42,59.21 47.42,59.55 47.97,60.1 47.97,60.928 48.912,61.87 53.275,61.87 53.545,62.14 ; 53.547,62.143 53.545,62.14 ; U2.G3@58.685,63.965 58.94,63.71 58.94,63.21 59.175,62.975 59.4,62.975 59.65,62.725 59.65,62.375 59.555,62.28 57.82,62.28 57.68,62.14 53.545,62.14
DDR_DQS1_P: U1.U19 U2.F3 | length 38.4
  Top Layer w0.1: U1.U19@39.2,57.1 39.48,57.38 39.72,57.38 40.75,56.35 41.1,56.35 41.625,56.875 42.25,56.875 42.49,56.635 42.49,56.39 42.305,56.205 41.805,56.205 41.52,55.92 41.52,55.58 41.587,55.512 42.23,54.87 42.49,54.61 42.49,53.875 42.925,53.44 43.725,53.44 44.19,53.905 44.19,55.56 44.28,55.65 45.39,55.65 45.47,55.57 45.47,54.45 45.717,54.203 46.058,54.203 46.33,54.475 46.33,56.41 46.4,56.48 47.355,56.48 47.65,56.775 47.65,57.447 47.81,57.607 48.187,57.607 48.42,57.84 48.42,58.535 47.65,59.305 47.65,59.455 48.2,60.005 48.2,60.833 49.007,61.64 53.37,61.64 53.64,61.91 57.775,61.91 57.915,62.05 59.65,62.05 59.88,62.28 59.88,62.82 59.495,63.205 59.27,63.205 59.17,63.305 59.17,63.72 U2.F3@59.45,64
DDR_ODT: R25.1 U1.H19 U2.K1 | length 46.8
  Top Layer w0.12: U1.H19@39.2,64.3 39.48,64.02 v1(39.85,64.02) ; v1(55.85,65.2) U2.K1@56.25,65.6
  Bottom Layer w0.12: v1(39.85,64.02) 40.298,64.02 41.22,64.942 41.22,66.271 40.96,66.531 40.96,68.836 41.3,69.176 41.3,70.794 44.1,73.594 44.376,73.594 44.5,73.47 44.599,73.47 44.925,73.47 45.03,73.575 45.275,73.575 45.38,73.47 45.845,73.47 45.95,73.575 46.325,73.575 46.445,73.455 47.025,73.455 47.145,73.575 47.323,73.575 47.65,73.247 47.65,71.725 47.575,71.65 47.575,65.003 49.478,63.1 54.42,63.1 55.45,64.13 55.45,64.509 55.7,64.759 55.7,64.98 ; 55.696,64.984 55.85,65.139 v1(55.85,65.2) 56.27,64.78 60.44,64.78 62.73,62.49 R25.1@65.85,62.49
DDR_RASN: R20.1 U1.L18 U2.J3 | length 48.7
  Top Layer w0.12: U1.L18@38.4,61.9 v1(38.8,62.3) ; v1(57.05,63.5) U2.J3@57.05,64
  Bottom Layer w0.12: v1(38.8,62.3) 39.431,62.3 40.041,62.91 42.4,62.91 42.944,63.454 42.944,64.086 43.2,64.342 43.2,65.397 42.9,65.697 42.9,66.967 42.64,67.227 42.64,68.14 42.98,68.48 42.98,70.098 44.082,71.2 45.525,71.2 46.025,70.7 46.025,69.565 45.64,69.18 45.64,68.965 46.025,68.58 46.025,67.805 45.733,67.512 45.733,67.253 46.025,66.96 46.025,65.95 45.768,65.692 45.768,65.338 46.025,65.08 46.025,64.327 46.619,63.734 46.619,63.201 46.731,63.089 47.264,63.089 48.212,62.14 55.203,62.14 55.533,61.81 56.48,61.81 56.75,62.08 56.75,63.2 v1(57.05,63.5) 57.395,63.155 57.395,62.675 58.13,61.94 60.376,61.94 64.066,58.25 R20.1@65.85,58.25
DDR_RESETN: R29.2 U1.G16 U2.T2 | length 24.8
  Top Layer w0.12: U1.G16@36.8,65.1 36.8,64.43 36.4,64.03 36.4,61.72 36.62,61.5 40.76,61.5 41.035,61.775 41.865,61.775 ; R29.2@41.875,63.2 41.865,63.19 41.865,61.775 ; U2.T2@51.45,64.8 51.85,64.4 51.85,63.891 51.599,63.64 48.32,63.64 46.3,61.62 46.3,60.792 45.728,60.22 44.782,60.22 44.2,60.802 44.2,61.48 44.07,61.61 42.86,61.61 42.695,61.775 41.865,61.775
DDR_WEN: R24.1 U1.J17 U2.L3 | length 49
  Top Layer w0.12: U1.J17@37.6,63.5 v1(38,63.9) ; U2.L3@55.45,64 55.75,63.7 v1(55.75,63.5)
  Bottom Layer w0.12: v1(38,63.9) 38,63.6 38.08,63.52 38.586,63.52 ; 38.593,63.527 38.71,63.41 40.876,63.41 41.406,63.94 41.58,63.94 41.77,63.75 41.99,63.75 42.104,63.864 42.104,64.434 42.4,64.73 42.4,65.05 42.06,65.39 42.06,66.619 41.8,66.879 41.8,68.488 42.14,68.828 42.14,70.446 44.169,72.475 44.695,72.475 44.87,72.3 44.98,72.3 45.155,72.475 45.725,72.475 45.9,72.3 46.025,72.3 46.2,72.475 46.775,72.475 46.865,72.385 46.865,64.675 48.92,62.62 54.87,62.62 55.074,62.824 55.554,62.824 55.75,63.02 v1(55.75,63.5) ; v1@55.77,63.52 56.39,64.14 57.513,64.14 58.873,62.78 60.98,62.78 63.39,60.37 R24.1@65.85,60.37
eMMC_SDIO2_D0: U1.C9 U5.A3 | length 17.1
  Top Layer w0.09: U5.A3@30.65,84.475 30.65,84.2 31.188,83.662 31.188,83.087
  Top Layer w0.13: v1(30.35,72.95) 30.35,81.4 31.188,82.238 31.188,83.087 ; v1(30.825,68.675) U1.C9@31.2,68.3
  Bottom Layer w0.13: v1(30.35,72.95) 30.35,72.075 30.825,71.6 v1(30.825,68.675)
eMMC_SDIO2_D1: U1.A8 U5.A4 | length 16.1
  Top Layer w0.09: U5.A4@30.15,84.475 30.15,83.95 30.475,83.625 30.475,83.25
  Top Layer w0.13: U1.A8@30.4,69.9 30.4,71.675 30.2,71.875 29.55,71.875 29.25,72.175 29.25,76.375 29.6,76.725 29.6,81.825 30.475,82.7 30.475,83.25
eMMC_SDIO2_D2: U1.A7 U5.A5 | length 15.9
  Top Layer w0.09: U5.A5@29.65,84.475 29.65,83.725 29.775,83.6 29.775,83.25
  Top Layer w0.13: U1.A7@29.6,69.9 29.6,70.975 29.5,71.075 29.025,71.075 28.45,71.65 28.45,76.85 28.85,77.25 28.85,82.175 29.775,83.1 29.775,83.25
eMMC_SDIO2_D3: U1.B9 U5.B2 | length 17.2
  Top Layer w0.09: U5.B2@31.15,84.975 31.4,84.725 31.875,84.725
  Top Layer w0.13: U1.B9@31.2,69.1 31.6,69.5 31.6,81.05 32.325,81.775 32.325,84.4 32,84.725 31.875,84.725
eMMC_SDIO2_D4: U1.B8 U5.B3 | length 16.7
  Top Layer w0.09: U5.B3@30.65,84.975 30.65,84.965 30.9,84.715 30.9,84.35 31.5,83.75 31.5,83.275
  Top Layer w0.13: U1.B8@30.4,69.1 30.8,69.5 30.8,81.3 31.5,82 31.5,83.275
eMMC_SDIO2_D5: U1.D9 U5.B4 | length 18.7
  Top Layer w0.09: U5.B4@30.15,84.975 30.4,84.725 30.4,84.05 30.85,83.6 30.85,83.25
  Top Layer w0.13: v1(29.85,72.4) 29.85,76.25 30,76.4 30,81.65 30.85,82.5 30.85,83.25 ; v1(30.825,67.875) U1.D9@31.2,67.5
  Bottom Layer w0.12: v1(29.85,72.4) 29.85,71.925 30.375,71.4 30.375,68.325 v1(30.825,67.875)
eMMC_SDIO2_D6: U1.B7 U5.B5 | length 17.6
  Top Layer w0.09: U5.B5@29.65,84.975 29.65,84.965 29.9,84.715 29.9,83.85 30.1,83.65 30.1,83.25
  Top Layer w0.13: U1.B7@29.6,69.1 30.05,69.55 30.05,71.25 29.825,71.475 29.275,71.475 28.85,71.9 28.85,76.6 29.225,76.975 29.225,82 30.1,82.875 30.1,83.25
eMMC_SDIO2_D7: U1.A9 U5.B6 | length 17.9
  Top Layer w0.09: U5.B6@29.15,84.975 29.4,84.725 v1(29.4,83.45)
  Top Layer w0.13: U1.A9@31.2,69.9 31.2,81.15 31.85,81.8 v1(31.85,83.45)
  Bottom Layer w0.09: v1(29.4,83.45) v1(31.85,83.45)